# Altium PCB A313.2.PcbDoc (part 1 of 3)
Units mm, origin at the board's own origin, x right, y up, seen from the top; angles counter-clockwise.
Board outline 230.01 x 157.01 mm, 2 copper layers (Top Layer, Bottom Layer); 268 components, 266 nets, 1114 pads, 1214 vias.
Unrouted connection lines stored in the file: 2.
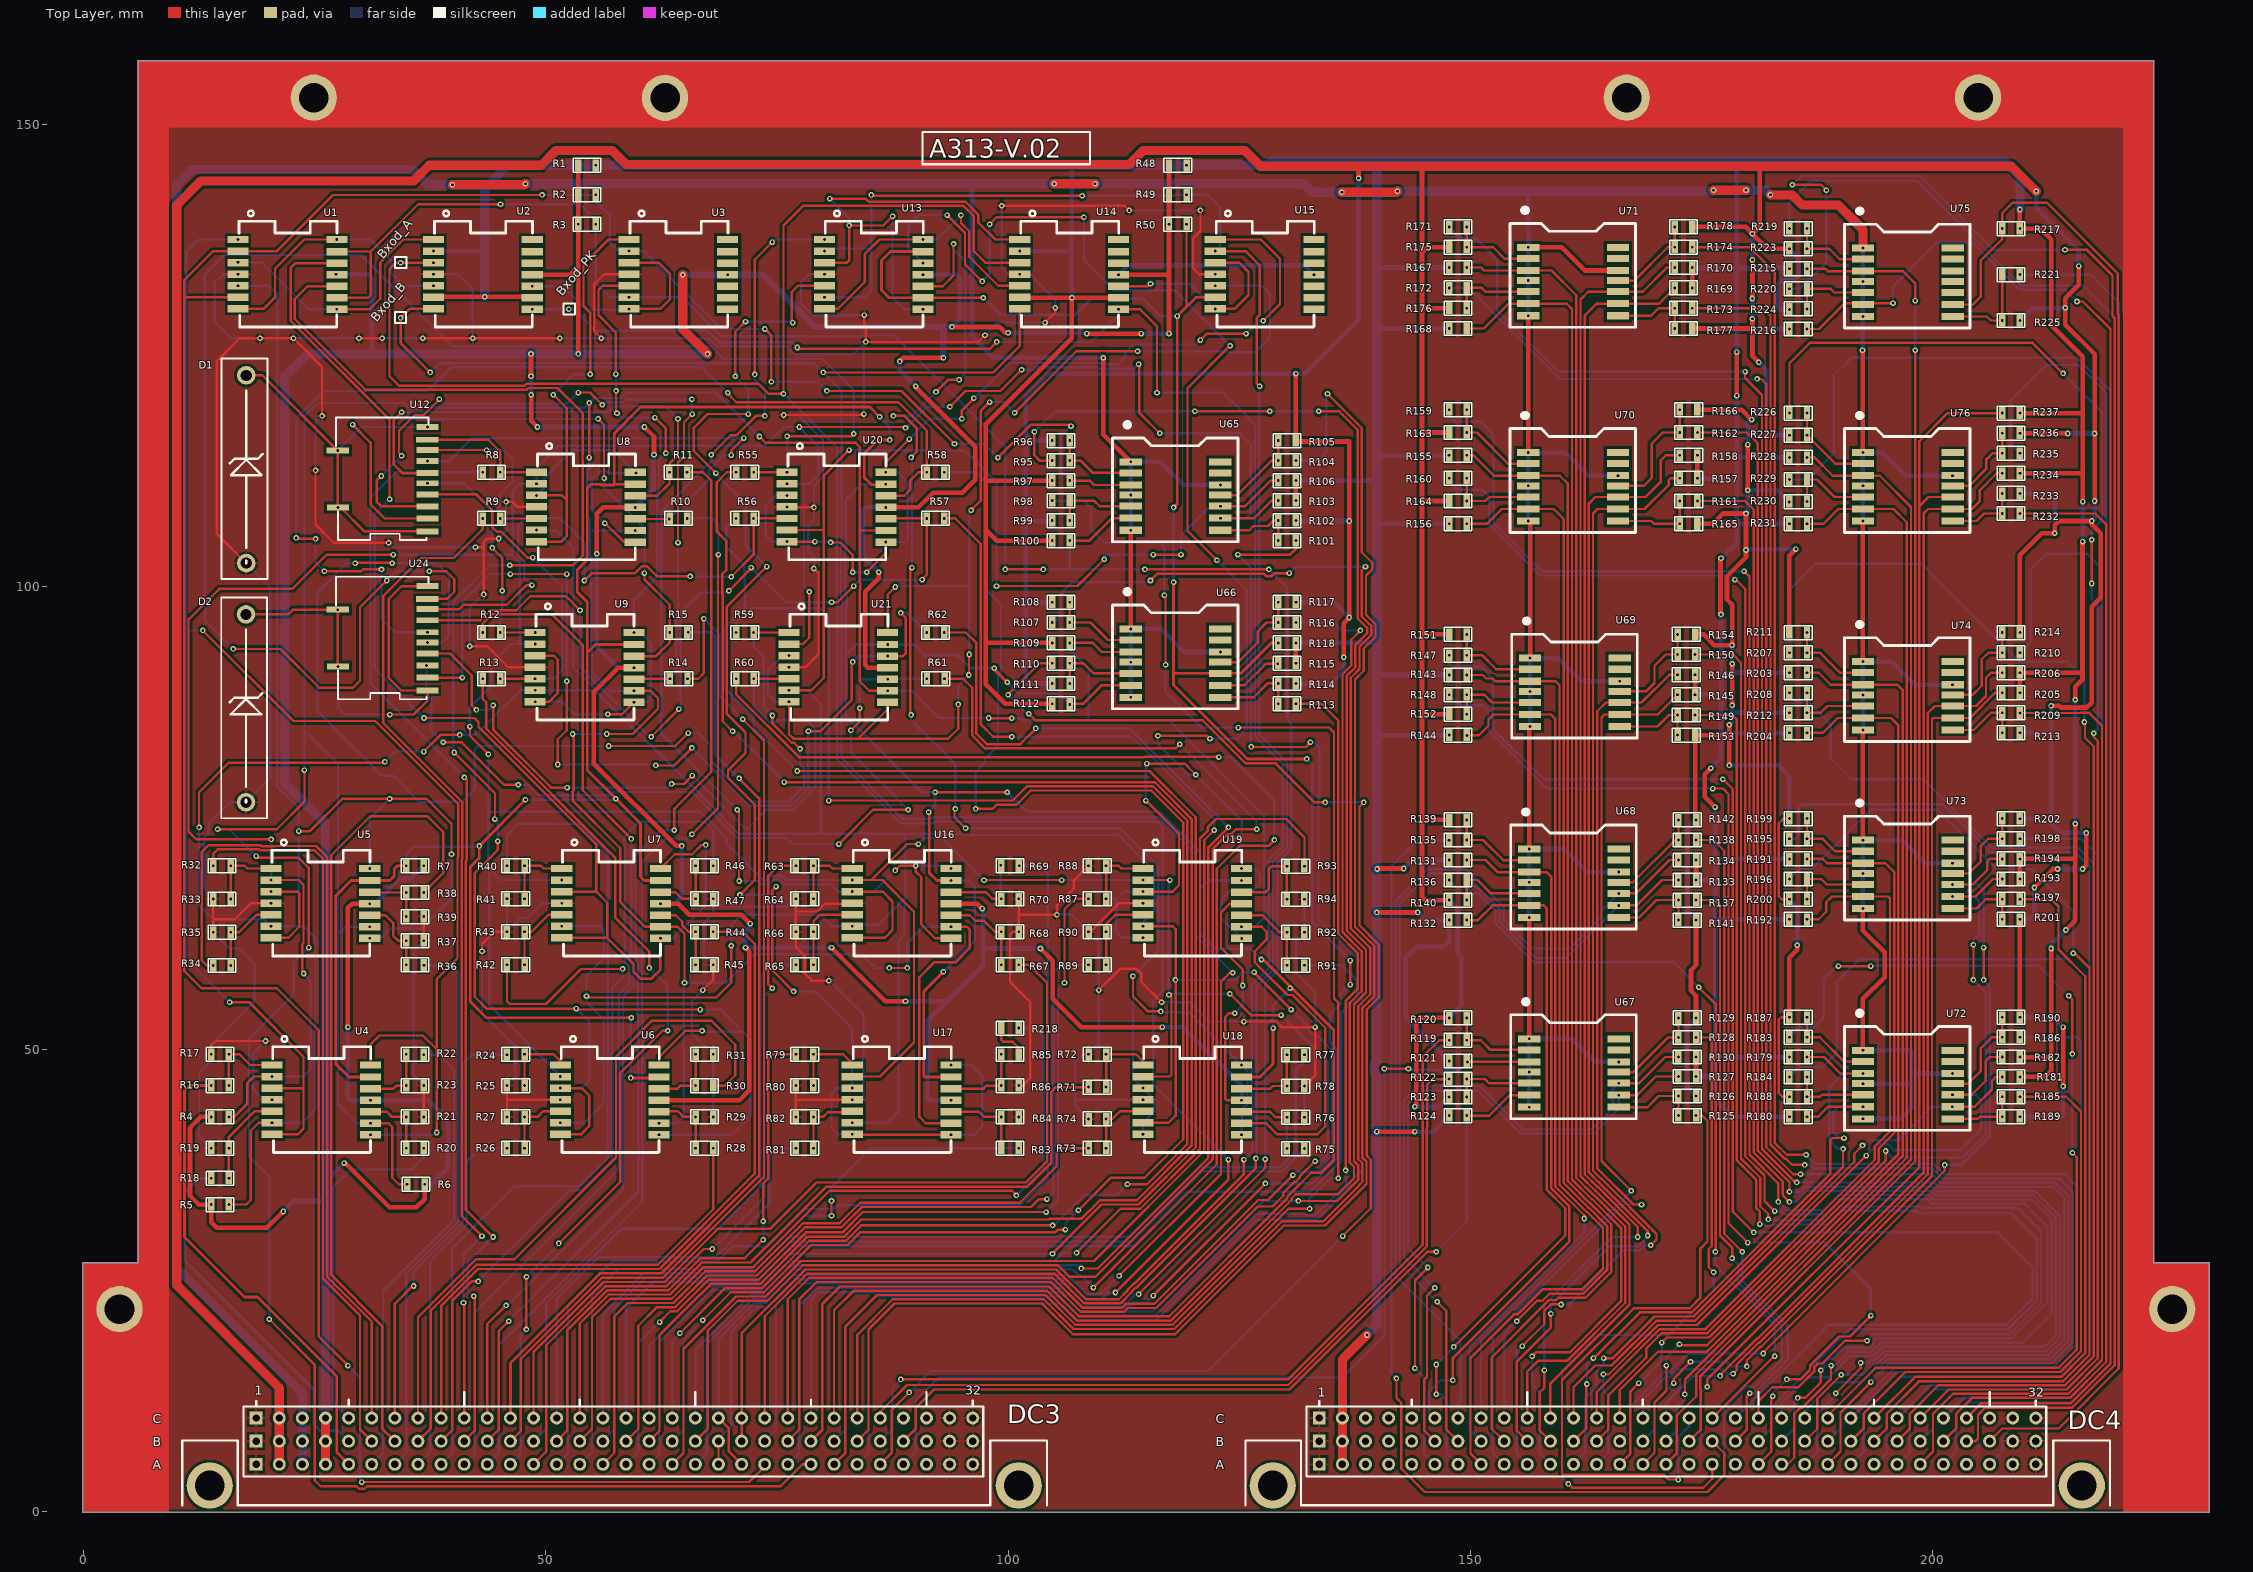
[diagram p0: Top Layer view]
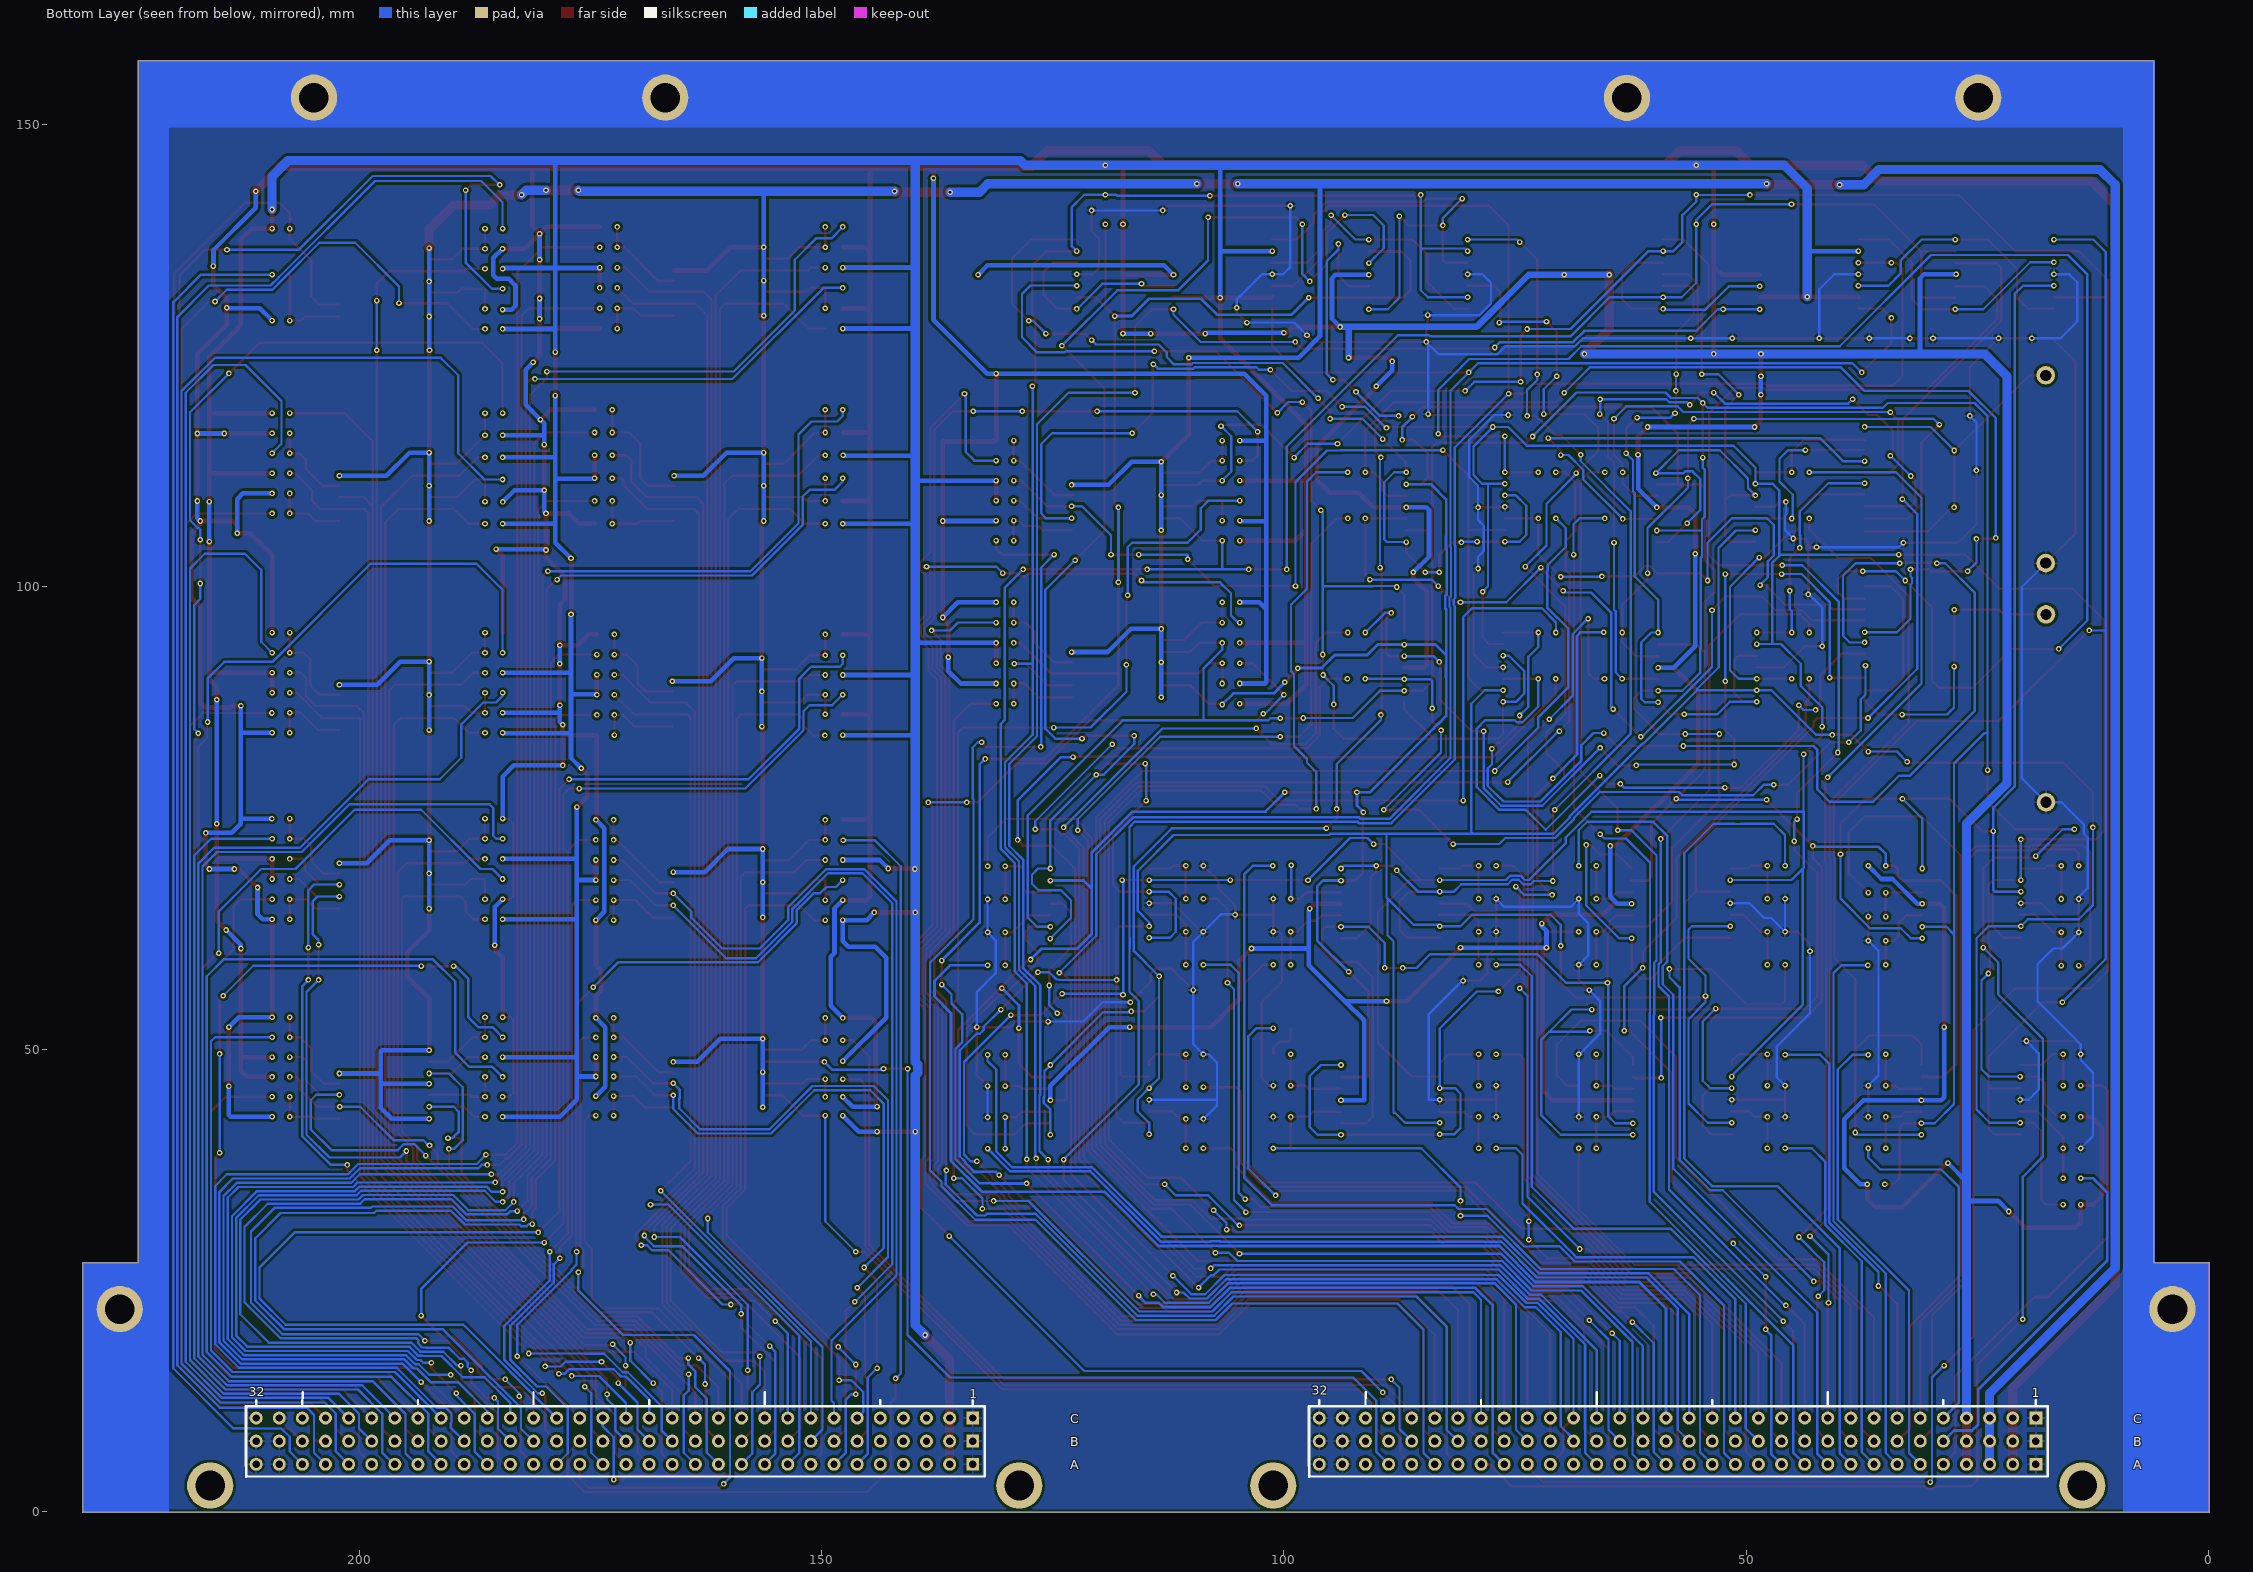
[diagram p1: Bottom Layer view, seen from below]

## Layer stack, top to bottom
Top Solder: solder mask 0.0102, Solder Resist, Dk 3.5
Top Layer: signal copper 0.0356
Dielectric1: dielectric 0.32, FR-4, Dk 4.8
Bottom Layer: signal copper 0.0356
Bottom Solder: solder mask 0.0102, Solder Resist, Dk 3.5

## Board outline
-0.095,-0.079 -0.095,26.921 cw(c-0.088,26.921) -0.088,26.928 5.905,26.928 5.905,156.921 cw(c5.912,156.921) 5.912,156.928 223.912,156.928 cw(c223.912,156.921) 223.919,156.921 223.919,26.928 229.912,26.928 cw(c229.912,26.921) 229.919,26.921 229.919,-0.079 cw(c229.912,-0.079) 229.912,-0.086 -0.088,-0.086 cw(c-0.088,-0.079)

## Design rules (kind name [scope] priority, off if disabled: settings)
Clearance [All] p1: gap=0.3 ignorepadtopadclearanceinfootprint=FALSE except(0: Arc-Hole Track-Hole SMDPad-Hole THPad-Hole Via-Hole Fill-Hole Poly-Hole Region-Hole Text-Hole; 0.1: SMDPad-SMDPad SMDPad-THPad THPad-THPad Fill-Fill Fill-Poly Fill-Region Poly-Poly Poly-Region Region-Region; 0.2: Arc-Arc Arc-Track Track-Track)
PolygonConnect [All] p1: connectstyle=Relief reliefconductorwidth=0.254 reliefentries=4 polygonreliefangle="90 Angle" airgapwidth=0.254
RoutingVias [All] p1: holewidth=0.3 width=0.6 viastyle="Through Hole" minholewidth=0.3 minwidth=0.6 maxholewidth=0.3 maxwidth=0.6
SolderMaskExpansion [All] p1: expansion=0.102
Width [All] p1: maxlimit=1 minlimit=0.254 preferedwidth=0.5
30 further rules are at their usual default settings.

## Components (designator, comment, footprint, x,y, rotation, side; value= is the part's Value field where it differs from the comment)
D1 "DIODE ZENER" "DIODE ZENER" 17.6,102.448 r0 top
D2 "DIODE ZENER" "DIODE ZENER" 17.575,76.59 r0 top
DC3 "DC96c" DC96c_DUC 52.95,23.196 r0 top locked
DC4 "DC96c" DC96c_DUC 167.925,23.196 r0 top locked
R1 "330K" R0805 53.776,145.693 r270 top
R2 "330K" R0805 53.776,142.509 r270 top
R3 "330K" R0805 53.776,139.325 r270 top
R4 "330K" R0805 14.1,42.783 r270 top
R5 "330K" R0805 14.1,33.3 r270 top
R6 "330K" R0805 36.624,35.307 r90 top
R7 "330K" R0805 36.526,69.757 r90 top
R8 "18k" R0805 43.451,112.494 r270 top
R9 "18k" R0805 43.451,107.511 r270 top
R10 "18k" R0805 65.024,107.325 r90 top
R11 "18k" R0805 65,112.308 r90 top
R12 "18k" R0805 43.451,95.168 r270 top
R13 "18k" R0805 43.451,90.175 r270 top
R14 "18k" R0805 65.049,89.989 r90 top
R15 "18k" R0805 65.024,94.982 r90 top
R16 "R" R0805 14.1,46.167 r270 top
R17 "R" R0805 14.1,49.55 r270 top
R18 "R" R0805 14.1,36.15 r270 top
R19 "R" R0805 14.1,39.4 r270 top
R20 "R" R0805 36.526,39.214 r90 top
R21 "R" R0805 36.526,42.597 r90 top
R22 "R" R0805 36.526,49.364 r90 top
R23 "R" R0805 36.526,45.981 r90 top
R24 "R" R0805 46.076,49.55 r270 top
R25 "R" R0805 46.076,46.167 r270 top
R26 "R" R0805 46.076,39.4 r270 top
R27 "R" R0805 46.076,42.783 r270 top
R28 "R" R0805 67.825,39.214 r90 top
R29 "R" R0805 67.825,42.597 r90 top
R30 "R" R0805 67.825,45.981 r90 top
R31 "R" R0805 67.825,49.364 r90 top
R32 "10K" R0805 14.3,69.943 r270 top
R33 "5K" R0805 14.3,66.346 r270 top
R34 "10K" R0805 14.3,59.152 r270 top
R35 "5K" R0805 14.3,62.749 r270 top
R36 "10K" R0805 36.526,59.039 r90 top
R37 "5K" R0805 36.526,61.658 r90 top
R38 "R" R0805 36.526,66.861 r90 top
R39 "R" R0805 36.526,64.26 r90 top
R40 "R" R0805 46.076,69.943 r270 top
R41 "R" R0805 46.076,66.37 r270 top
R42 "R" R0805 46.076,59.225 r270 top
R43 "R" R0805 46.076,62.798 r270 top
R44 "R" R0805 67.825,62.612 r90 top
R45 "R" R0805 67.825,59.039 r90 top
R46 "R" R0805 67.825,69.757 r90 top
R47 "R" R0805 67.825,66.184 r90 top
R48 "330K" R0805 117.676,145.693 r270 top
R49 "330K" R0805 117.676,142.509 r270 top
R50 "330K" R0805 117.676,139.325 r270 top
R55 "18k" R0805 70.85,112.494 r270 top
R56 "18k" R0805 70.85,107.511 r270 top
R57 "18k" R0805 92.825,107.325 r90 top
R58 "18k" R0805 92.825,112.308 r90 top
R59 "18k" R0805 70.85,95.168 r270 top
R60 "18k" R0805 70.875,90.175 r270 top
R61 "18k" R0805 92.85,89.989 r90 top
R62 "18k" R0805 92.825,94.982 r90 top
R63 "R" R0805 77.325,69.943 r270 top
R64 "R" R0805 77.325,66.37 r270 top
R65 "R" R0805 77.325,59.225 r270 top
R66 "R" R0805 77.325,62.798 r270 top
R67 "R" R0805 100.874,59.039 r90 top
R68 "R" R0805 100.874,62.612 r90 top
R69 "R" R0805 100.874,69.757 r90 top
R70 "R" R0805 100.874,66.184 r90 top
R71 "R" R0805 108.976,46.004 r270 top
R72 "R" R0805 108.976,49.55 r270 top
R73 "R" R0805 108.976,39.4 r270 top
R74 "R" R0805 108.976,42.564 r270 top
R75 "R" R0805 131.775,39.164 r90 top
R76 "R" R0805 131.775,42.547 r90 top
R77 "R" R0805 131.775,49.314 r90 top
R78 "R" R0805 131.775,45.931 r90 top
R79 "R" R0805 77.325,49.55 r270 top
R80 "R" R0805 77.325,46.167 r270 top
R81 "R" R0805 77.325,39.4 r270 top
R82 "R" R0805 77.325,42.783 r270 top
R83 "R" R0805 100.874,39.214 r90 top
R84 "R" R0805 100.874,42.597 r90 top
R85 "R" R0805 100.874,49.364 r90 top
R86 "R" R0805 100.874,45.981 r90 top
R87 "R" R0805 108.976,66.37 r270 top
R88 "R" R0805 108.976,69.943 r270 top
R89 "R" R0805 108.976,59.225 r270 top
R90 "R" R0805 108.976,62.798 r270 top
R91 "R" R0805 131.775,58.989 r90 top
R92 "R" R0805 131.775,62.562 r90 top
R93 "R" R0805 131.775,69.707 r90 top
R94 "R" R0805 131.775,66.134 r90 top
R95 "2,2k" R0805 106.4,113.576 r90 top
R96 "33k" R0805 105.052,115.925 r270 top
R97 "4,7k" R0805 106.4,111.413 r90 top
R98 "2,2k" R0805 106.4,109.251 r90 top
R99 "33k" R0805 105.052,107.274 r270 top
R100 "4,7k" R0805 106.4,104.925 r90 top
R101 "2,2k" R0805 129.5,105.111 r270 top
R102 "33k" R0805 130.848,107.088 r90 top
R103 "4,7k" R0805 129.5,109.437 r270 top
R104 "2,2k" R0805 129.5,113.762 r270 top
R105 "33k" R0805 130.848,115.739 r90 top
R106 "4,7k" R0805 129.5,111.599 r270 top
R107 "2,2k" R0805 106.4,96.059 r90 top
R108 "33k" R0805 105.052,98.443 r270 top
R109 "4,7k" R0805 106.4,93.861 r90 top
R110 "2,2k" R0805 106.4,91.664 r90 top
R111 "33k" R0805 105.052,89.652 r270 top
R112 "4,7k" R0805 106.4,87.268 r90 top
R113 "2,2k" R0805 129.5,87.454 r270 top
R114 "33k" R0805 130.848,89.466 r90 top
R115 "4,7k" R0805 129.5,91.85 r270 top
R116 "2,2k" R0805 129.5,96.245 r270 top
R117 "33k" R0805 130.848,98.257 r90 top
R118 "4,7k" R0805 129.5,94.047 r270 top
R119 "2,2k" R0805 149.323,50.888 r90 top
R120 "33k" R0805 147.975,53.488 r270 top
R121 "4,7k" R0805 149.323,48.638 r90 top
R122 "2,2k" R0805 149.323,46.688 r90 top
R123 "33k" R0805 147.975,44.938 r270 top
R124 "4,7k" R0805 149.323,42.738 r90 top
R125 "2,2k" R0805 172.775,42.924 r270 top
R126 "33k" R0805 174.123,44.851 r90 top
R127 "4,7k" R0805 172.775,47.149 r270 top
R128 "2,2k" R0805 172.775,51.375 r270 top
R129 "33k" R0805 174.123,53.302 r90 top
R130 "4,7k" R0805 172.775,49.262 r270 top
R131 "4,7k" R0805 149.323,70.381 r90 top
R132 "4,7k" R0805 149.323,63.878 r90 top
R133 "4,7k" R0805 172.775,68.4 r270 top
R134 "4,7k" R0805 172.775,70.567 r270 top
R135 "2,2k" R0805 149.323,72.549 r90 top
R136 "2,2k" R0805 149.323,68.214 r90 top
R137 "2,2k" R0805 172.775,66.232 r270 top
R138 "2,2k" R0805 172.775,72.735 r270 top
R139 "33k" R0805 147.975,74.903 r270 top
R140 "33k" R0805 147.975,66.232 r270 top
R141 "33k" R0805 174.123,63.878 r90 top
R142 "33k" R0805 174.123,74.717 r90 top
R143 "4,7k" R0805 149.323,90.388 r90 top
R144 "4,7k" R0805 149.323,83.888 r90 top
R145 "4,7k" R0805 172.675,88.429 r270 top
R146 "4,7k" R0805 172.675,90.607 r270 top
R147 "2,2k" R0805 149.323,92.513 r90 top
R148 "2,2k" R0805 149.323,88.263 r90 top
R149 "2,2k" R0805 172.675,86.252 r270 top
R150 "2,2k" R0805 172.675,92.785 r270 top
R151 "33k" R0805 147.975,94.963 r270 top
R152 "33k" R0805 147.975,86.338 r270 top
R153 "33k" R0805 174.023,83.888 r90 top
R154 "33k" R0805 174.023,94.777 r90 top
R155 "4,7k" R0805 149.323,114.145 r90 top
R156 "4,7k" R0805 149.323,106.745 r90 top
R157 "4,7k" R0805 172.925,111.864 r270 top
R158 "4,7k" R0805 172.925,114.331 r270 top
R159 "2,2k" R0805 149.323,119.078 r90 top
R160 "2,2k" R0805 149.323,111.678 r90 top
R161 "2,2k" R0805 172.925,109.397 r270 top
R162 "2,2k" R0805 172.925,116.797 r270 top
R163 "33k" R0805 147.975,116.797 r270 top
R164 "33k" R0805 147.975,109.397 r270 top
R165 "33k" R0805 174.273,106.745 r90 top
R166 "33k" R0805 174.273,119.078 r90 top
R167 "4,7k" R0805 149.323,134.452 r90 top
R168 "4,7k" R0805 149.323,127.859 r90 top
R169 "4,7k" R0805 172.375,132.44 r270 top
R170 "4,7k" R0805 172.375,134.638 r270 top
R171 "2,2k" R0805 149.323,138.848 r90 top
R172 "2,2k" R0805 149.323,132.254 r90 top
R173 "2,2k" R0805 172.375,130.243 r270 top
R174 "2,2k" R0805 172.375,136.836 r270 top
R175 "33k" R0805 147.975,136.836 r270 top
R176 "33k" R0805 147.975,130.243 r270 top
R177 "33k" R0805 173.723,127.859 r90 top
R178 "33k" R0805 173.723,138.848 r90 top
R179 "4,7k" R0805 186.123,49.067 r90 top
R180 "4,7k" R0805 186.123,42.624 r90 top
R181 "4,7k" R0805 207.8,47.105 r270 top
R182 "4,7k" R0805 207.8,49.253 r270 top
R183 "2,2k" R0805 186.123,51.215 r90 top
R184 "2,2k" R0805 186.123,46.92 r90 top
R185 "2,2k" R0805 207.8,44.958 r270 top
R186 "2,2k" R0805 207.8,51.401 r270 top
R187 "33k" R0805 184.775,53.549 r270 top
R188 "33k" R0805 184.775,44.958 r270 top
R189 "33k" R0805 209.148,42.624 r90 top
R190 "33k" R0805 209.148,53.363 r90 top
R191 "4,7k" R0805 186.123,70.5 r90 top
R192 "4,7k" R0805 186.123,63.967 r90 top
R193 "4,7k" R0805 207.8,68.509 r270 top
R194 "4,7k" R0805 207.8,70.686 r270 top
R195 "2,2k" R0805 186.123,72.678 r90 top
R196 "2,2k" R0805 186.123,68.323 r90 top
R197 "2,2k" R0805 207.8,66.331 r270 top
R198 "2,2k" R0805 207.8,72.864 r270 top
R199 "33k" R0805 184.775,75.042 r270 top
R200 "33k" R0805 184.775,66.331 r270 top
R201 "33k" R0805 209.148,63.967 r90 top
R202 "33k" R0805 209.148,74.856 r90 top
R203 "4,7k" R0805 186.123,90.636 r90 top
R204 "4,7k" R0805 186.123,84.133 r90 top
R205 "4,7k" R0805 207.8,88.655 r270 top
R206 "4,7k" R0805 207.8,90.822 r270 top
R207 "2,2k" R0805 186.123,92.804 r90 top
R208 "2,2k" R0805 186.123,88.469 r90 top
R209 "2,2k" R0805 207.8,86.487 r270 top
R210 "2,2k" R0805 207.8,92.99 r270 top
R211 "33k" R0805 184.775,95.158 r270 top
R212 "33k" R0805 184.775,86.487 r270 top
R213 "33k" R0805 209.148,84.133 r90 top
R214 "33k" R0805 209.148,94.972 r90 top
R215 "4,7k" R0805 186.123,134.323 r90 top
R216 "4,7k" R0805 186.123,127.813 r90 top
R217 "4,7k" R0805 207.8,138.849 r270 top
R218 "R" R0805 100.874,52.2 r90 top (schematic designator R85)
R219 "2,2k" R0805 186.123,138.663 r90 top
R220 "2,2k" R0805 186.123,132.153 r90 top
R221 "2,2k" R0805 207.8,133.879 r270 top
R223 "33k" R0805 184.775,136.679 r270 top
R224 "33k" R0805 184.775,130.169 r270 top
R225 "33k" R0805 209.148,128.724 r90 top
R226 "2,2k" R0805 186.123,118.709 r90 top
R227 "33k" R0805 184.775,116.502 r270 top
R228 "4,7k" R0805 186.123,113.923 r90 top
R229 "2,2k" R0805 186.123,111.53 r90 top
R230 "33k" R0805 184.775,109.323 r270 top
R231 "4,7k" R0805 186.123,106.745 r90 top
R232 "2,2k" R0805 207.8,108.045 r270 top
R233 "33k" R0805 209.148,110.029 r90 top
R234 "4,7k" R0805 207.8,112.385 r270 top
R235 "2,2k" R0805 207.8,114.555 r270 top
R236 "33k" R0805 209.148,116.539 r90 top
R237 "4,7k" R0805 207.8,118.895 r270 top
U1 "168KT2B" 168KT2B-1 16.825,139.4 r0 top
U2 "168KT2B" 168KT2B-1 37.96,139.4 r0 top
U3 "168KT2B" 168KT2B-1 59.095,139.4 r0 top
U4 "168KT2B" 168KT2B-1 20.475,50.125 r0 top
U5 "168KT2B" 168KT2B-1 20.392,71.376 r0 top
U6 "168KT2B" 168KT2B-1 51.675,50.125 r0 top
U7 "168KT2B" 168KT2B-1 51.819,71.376 r0 top
U8 "168KT2B" 168KT2B-1 49.1,114.232 r0 top
U9 "168KT2B" 168KT2B-1 48.95,96.9 r0 top
U12 "2D908A" 2d908a 27.316,118.28 r270 top
U13 "168KT2B" 168KT2B-1 80.23,139.4 r0 top
U14 "168KT2B" 168KT2B-1 101.365,139.4 r0 top
U15 "168KT2B" 168KT2B-1 122.5,139.4 r0 top
U16 "168KT2B" 168KT2B-1 83.247,71.376 r0 top
U17 "168KT2B" 168KT2B-1 83.247,50.125 r0 top
U18 "168KT2B" 168KT2B-1 114.675,50.125 r0 top
U19 "168KT2B" 168KT2B-1 114.675,71.376 r0 top
U20 "168KT2B" 168KT2B-1 76.2,114.232 r0 top
U21 "168KT2B" 168KT2B-1 76.4,96.9 r0 top
U24 "2D908A" 2d908a 27.316,101.067 r270 top
U65 "198-HT7" 198-ht7 116.425,112.9 r270 top
U66 "198-HT7" 198-ht7 116.425,94.828 r270 top
U67 "198-HT7" 198-ht7 159.517,50.5 r270 top
U68 "198-HT7" 198-ht7 159.517,71.025 r270 top
U69 "198-HT7" 198-ht7 159.617,91.669 r270 top
U70 "198-HT7" 198-ht7 159.417,113.9 r270 top
U71 "198-HT7" 198-ht7 159.417,136.098 r270 top
U72 "198-HT7" 198-ht7 195.615,49.25 r270 top
U73 "198-HT7" 198-ht7 195.615,71.984 r270 top
U74 "198-HT7" 198-ht7 195.615,91.293 r270 top
U75 "198-HT7" 198-ht7 195.615,136.016 r270 top
U76 "198-HT7" 198-ht7 195.615,113.9 r270 top

## Footprints (in the part's own frame and the unit in brackets; to place one, negate y for a bottom-side part, rotate by r counter-clockwise, add the part's x,y. Pads: shape width x height; smd on the part's side, far side on the other; paste and mask are expansions set on the pad)
2d908a [mil]
  rect 25x95 smd: 1(427.83,389.13) 2(376.64,389.13) 3(325.48,389.13) 4(278.23,389.13) 5(234.93,389.13) 6(183.74,389.13) 7(136.49,389.13) 8(92.63,388.01) 9(38.36,389.08) 10(138.63,6.81) 11(381.16,8.11) 12(482.83,389.08)
  silkscreen extent -1,-1 520,394
168KT2B-1 [mm]
  rect 2.286x0.8 smd: 1(-0.1,-1.824) 2(-0.1,-3.074) 3(-0.1,-4.324) 4(-0.1,-5.574) 5(-0.1,-6.824) 6(-0.1,-8.074) 7(-0.1,-9.324) 8(10.575,-9.374) 9(10.575,-8.124) 10(10.575,-6.874) 11(10.575,-5.624) 12(10.575,-4.374) 13(10.575,-3.124) 14(10.575,-1.824)
  silkscreen extent 0,-11.28 10.6,1.3
198-ht7 [mil]
  rect 30x95 smd: 1(-25.04,-124.68) 2(22.21,-124.68) 3(73.4,-124.68) 4(116.7,-124.68) 5(163.95,-124.68) 6(215.11,-124.68) 7(266.3,-124.68) 8(266.3,257.2) 9(215.11,257.2) 10(163.95,257.2) 11(116.7,257.2) 12(73.4,257.2) 13(22.21,257.2) 14(-25.04,257.2)
  silkscreen extent -183,-203 315,332
DC96c_DUC [mm]
  round 5 hole 3.2: A(-39.3,-20.375) B(48.2,-20.375)
  rect 1.4x1.4 hole 0.8: A1(-34.275,-18.075) B1(-34.275,-15.575) C1(-34.275,-13.075)
  round 1.4 hole 0.8: A2(-31.775,-18.075) A3(-29.275,-18.075) A4(-26.775,-18.075) A5(-24.275,-18.075) A6(-21.775,-18.075) A7(-19.275,-18.075) A8(-16.775,-18.075) A9(-14.275,-18.075) A10(-11.775,-18.075) A11(-9.275,-18.075) A12(-6.775,-18.075) A13(-4.275,-18.075) A14(-1.775,-18.075) A15(0.725,-18.075) A16(3.225,-18.075) A17(5.725,-18.075) A18(8.225,-18.075) A19(10.725,-18.075) A20(13.225,-18.075) A21(15.725,-18.075) A22(18.225,-18.075) A23(20.725,-18.075) A24(23.225,-18.075) A25(25.725,-18.075) A26(28.225,-18.075) A27(30.725,-18.075) A28(33.225,-18.075) A29(35.725,-18.075) A30(38.225,-18.075) A31(40.725,-18.075) A32(43.225,-18.075) B2(-31.775,-15.575) B3(-29.275,-15.575) B4(-26.775,-15.575) B5(-24.275,-15.575) B6(-21.775,-15.575) B7(-19.275,-15.575) B8(-16.775,-15.575) B9(-14.275,-15.575) B10(-11.775,-15.575) B11(-9.275,-15.575) B12(-6.775,-15.575) B13(-4.275,-15.575) B14(-1.775,-15.575) B15(0.725,-15.575) B16(3.225,-15.575) B17(5.725,-15.575) B18(8.225,-15.575) B19(10.725,-15.575) B20(13.225,-15.575) B21(15.725,-15.575) B22(18.225,-15.575) B23(20.725,-15.575) B24(23.225,-15.575) B25(25.725,-15.575) B26(28.225,-15.575) B27(30.725,-15.575) B28(33.225,-15.575) B29(35.725,-15.575) B30(38.225,-15.575) B31(40.725,-15.575) B32(43.225,-15.575) C2(-31.775,-13.075) C3(-29.275,-13.075) C4(-26.775,-13.075) C5(-24.275,-13.075) C6(-21.775,-13.075) C7(-19.275,-13.075) C8(-16.775,-13.075) C9(-14.275,-13.075) C10(-11.775,-13.075) C11(-9.275,-13.075) C12(-6.775,-13.075) C13(-4.275,-13.075) C14(-1.775,-13.075) C15(0.725,-13.075) C16(3.225,-13.075) C17(5.725,-13.075) C18(8.225,-13.075) C19(10.725,-13.075) C20(13.225,-13.075) C21(15.725,-13.075) C22(18.225,-13.075) C23(20.725,-13.075) C24(23.225,-13.075) C25(25.725,-13.075) C26(28.225,-13.075) C27(30.725,-13.075) C28(33.225,-13.075) C29(35.725,-13.075) C30(38.225,-13.075) C31(40.725,-13.075) C32(43.225,-13.075)
  silkscreen extent -42.25,-22.5 51.25,-10.3
"DIODE ZENER" [mm]
  round 2 hole 1.2: 1(0,0.125) 2(0,20.445)
  silkscreen extent -2.67,-1.6 2.29,22.28
R0805 [mm]
  rect 1.3x0.7 smd: 1(0.093,1.624) 2(0.093,-0.276)
  silkscreen extent -0.66,-0.83 0.84,2.17

## Part data
R1 R2 R3 R4 R5 R6 R7 R8 R9 R10 R11 R12 R13 R14 R15 R32 R33 R34 R35 R36 R37 R48 R49 R50 R55 R56 R57 R58 R59 R60 R61 R62 R95 R96 R97 R98 R99 R100 R101 R102 R103 R104 R105 R106 R107 R108 R109 R110 R111 R112 R113 R114 R115 R116 R117 R118 R119 R120 R121 R122 R123 R124 R125 R126 R127 R128 R129 R130 R131 R132 R133 R134 R135 R136 R137 R138 R139 R140 R141 R142 R143 R144 R145 R146 R147 R148 R149 R150 R151 R152 R153 R154 R155 R156 R157 R158 R159 R160 R161 R162 R163 R164 R165 R166 R167 R168 R169 R170 R171 R172 R173 R174 R175 R176 R177 R178 R179 R180 R181 R182 R183 R184 R185 R186 R187 R188 R189 R190 R191 R192 R193 R194 R195 R196 R197 R198 R199 R200 R201 R202 R203 R204 R205 R206 R207 R208 R209 R210 R211 R212 R213 R214 R215 R216 R217 R219 R220 R221 R223 R224 R225 R226 R227 R228 R229 R230 R231 R232 R233 R234 R235 R236 R237: library part R
U1: library part 168KT2B_0
U2 U3 U4 U5 U6 U7 U8 U9 U13 U14 U15 U16 U17 U18 U19 U20 U21: library part 168KT2B_5
U12: library part 2D908A_1
U24: library part 2D908A_2
U65 U66 U67 U68 U69 U70 U71 U72 U73 U74 U75 U76: library part 198-HT7_0

## Free pads (board coordinates)
  round 5 hole 3.2: 2(3.9,21.9) 2(24.9,152.921) 2(62.9,152.9) 2(166.9,152.921) 2(204.9,152.921) 2(225.9,21.9)

## Via types
v1: diameter 0.6, hole 0.3, Top Layer to Bottom Layer, 1214 vias

## Nets (pads, with @x,y where several pads share a name; then routed paths per layer and width w, separated by ;. In a path a pad name is that pad's centre, name@x,y a point inside that pad or via, vN(x,y) a via of type N, cw(c..) or ccw(c..) an arc to the next point about the centre after c; other vN are vias at no path point)
1-1: R8.1 U8.1 U12.8 | length 14.6
  Top Layer w0.254: U12.8@37.172,115.927 43.773,115.927 45.075,114.625 v1(45.075,112.401) 45.082,112.408 U8.1@49,112.408
1-2: R9.1 U8.5 U12.7 | length 20.6
  Top Layer w0.254: U12.7@37.2,114.813 43.587,114.813 v1(43.6,114.8) ; v1(45.085,107.408) U8.5@49,107.408
  Bottom Layer w0.254: v1(43.6,114.8) 45.462,114.8 46.4,113.862 46.4,111.41 44.973,109.983 44.973,107.52 v1(45.085,107.408)
1-3: R10.1 U8.10 U12.6 | length 51.6
  Top Layer w0.254: U8.10@59.675,107.358 v1(63.34,107.358) R10.1@63.4,107.418 ; v1(70.049,114.267) 70.049,114.749 v1(71.4,116.1)
  Bottom Layer w0.254: v1(37.2,113.613) 39.535,113.613 42.022,116.1 v1(71.4,116.1) ; v1(63.34,107.358) 67.618,111.636 67.618,112.676 69.209,114.267 v1(70.049,114.267)
1-4: R11.1 U8.12 U12.5 | length 52.4
  Top Layer w0.254: v1(34.4,118.9) 33.554,118.054 33.554,113.246 34.487,112.313 U12.5@37.2,112.313 ; U8.12@59.675,109.858 62.058,109.858 63.376,111.176 v1(63.376,112.401) 63.376,113.338 64.3,114.262 v1(64.3,118.2)
  Bottom Layer w0.254: v1(34.4,118.9) 34.427,118.927 56.799,118.927 57.399,119.527 62.973,119.527 v1(64.3,118.2)
1-5: R12.1 U9.1 U12.4 | length 25.7
  Top Layer w0.254: v1(44.2,104.222) 45.3,103.122 v1(45.3,99.6) ; v1(45.075,95.075) v1(48.849,95.075) U9.1@48.85,95.076
  Bottom Layer w0.254: v1(37.2,111.213) 41.131,111.213 44.2,108.144 44.2,105.57 44.173,105.543 44.173,104.249 v1(44.2,104.222) ; v1(45.075,95.075) 45.075,97.375 45.3,97.6 v1(45.3,99.6)
1-6: R13.1 U9.5 U12.3 | length 35.9
  Top Layer w0.254: U12.3@37.2,110.013 42.514,110.013 44.2,108.327 44.2,106.5 44.731,105.969 45.201,105.969 47.992,103.178 v1(48.6,103.178) ; v1(45.075,90.082) v1(48.844,90.082) U9.5@48.85,90.076
  Bottom Layer w0.254: v1(48.6,103.178) 51.756,100.022 51.756,91.004 50.834,90.082 v1(48.844,90.082)
1-7: R14.1 U9.10 U12.2 | length 84.3
  Top Layer w0.254: v1(32.2,112) 31.7,111.5 31.7,109.244 32.23,108.713 U12.2@37.2,108.713 ; v1(34.4,114.2) 34.127,114.473 34.127,116.903 35.824,118.6 36.8,118.6 v1(38.5,120.3) ; v1(53.5,121.027) 54.773,121.027 v1(56.1,119.7) ; U9.10@59.525,90.026 59.581,90.082 v1(63.425,90.082) ; v1(64.3,104.8) 64.3,113.446 64.954,114.1 64.954,117.823 v1(65.831,118.7)
  Bottom Layer w0.254: v1(32.2,112) v1(34.4,114.2) ; v1(38.5,120.3) 38.965,119.835 52.308,119.835 v1(53.5,121.027) ; v1(56.1,119.7) 56.381,119.981 58.323,119.981 58.642,120.3 v1(65.8,120.3) 65.8,118.731 v1(65.831,118.7) ; v1(63.425,90.082) 64.127,90.784 64.127,97.369 64.3,97.542 v1(64.3,104.8)
1-8: R15.1 U9.12 U12.1 | length 74.9
  Top Layer w0.254: v1(29.1,117.561) 31.076,115.585 31.076,108.924 32.587,107.413 U12.1@37.2,107.413 ; v1(55.652,118.2) 56.3,117.552 v1(56.3,111.771) ; U9.12@59.525,92.526 61.926,92.526 63.4,94 v1(63.4,95.075) 63.4,98.073 60.67,100.803 v1(60.67,101.5)
  Bottom Layer w0.254: v1(29.1,117.561) 29.739,118.2 34.072,118.2 34.099,118.173 55.625,118.173 v1(55.652,118.2) ; v1(56.3,111.771) 56.3,110.733 60.67,106.363 v1(60.67,101.5)
1A: R16.1 R17.1 U4.1 | length 8.5
  Top Layer w0.254: v1(15.724,46.074) v1(15.724,49.457) 16.874,49.457 18.029,48.301 U4.1@20.375,48.301
1B: R32.1 R33.1 U5.1 | length 8.1
  Top Layer w0.254: v1(15.924,66.253) v1(15.924,69.85) 17.45,69.85 17.747,69.553 U5.1@20.292,69.553
2A: R18.1 R19.1 U4.5 | length 10.3
  Top Layer w0.254: v1(15.724,36.057) v1(15.724,39.307) 15.724,40.524 18.501,43.301 U4.5@20.375,43.301
2B: R34.1 R35.1 U5.5 | length 8.8
  Top Layer w0.254: v1(15.924,59.059) v1(15.924,62.656) 16.825,62.656 18.722,64.553 U5.5@20.292,64.553
3A: R20.1 R21.1 U4.10 | length 7.5
  Top Layer w0.254: U4.10@31.05,43.251 32.82,43.251 33.381,42.69 v1(34.902,42.69) v1(34.902,39.307)
3B: R36.1 R37.1 U5.10 | length 8.5
  Top Layer w0.254: U5.10@30.967,64.503 32.668,64.503 33.5,63.671 33.5,62.264 34.013,61.751 v1(34.902,61.751) v1(34.902,59.132)
4-1: R55.1 U20.1 U24.8 | length 178.9
  Top Layer w0.254: v1(16.2,93.3) 21.3,93.3 25.5,89.1 29.136,89.1 29.9,89.864 29.9,97.8 v1(32.8,100.7) ; U24.8@37.172,98.714 39.327,98.714 40.1,99.487 40.1,100.829 39.229,101.7 v1(37.4,101.7) ; R55.1@72.474,112.401 v1(72.481,112.408) v1(76.1,112.408) ; v1(76.09,116.31) 83.028,116.31 v1(83.3,116.582)
  Bottom Layer w0.254: v1(16.2,93.3) 13.1,96.4 13.1,133.8 15.2,135.9 30,135.9 39.873,126.027 67.843,126.027 69.215,124.655 79.945,124.655 83.3,121.3 v1(83.3,116.582) ; v1(32.8,100.7) 33.8,101.7 v1(37.4,101.7) ; v1(76.09,116.31) 76.1,116.3 v1(76.1,112.408)
4-2: R56.1 U20.5 U24.7 | length 60.1
  Top Layer w0.254: U24.7@37.2,97.6 40.625,97.6 41.098,98.073 45.773,98.073 47.9,100.2 v1(48.5,100.2) ; v1(54.181,100.7) 54.981,101.5 59.642,101.5 60.369,102.227 60.971,102.227 62.052,101.146 v1(65.6,101.146) ; v1(70.054,101.1) 72.474,103.52 v1(72.474,107.418) 76.09,107.418 U20.5@76.1,107.408
  Bottom Layer w0.254: v1(48.5,100.2) 47.654,101.046 47.654,102.788 47.025,103.417 47.025,106.706 47.755,107.436 51.526,107.436 54.181,104.781 v1(54.181,100.7) ; v1(65.6,101.146) 65.646,101.1 v1(70.054,101.1)
4-3: R57.1 U20.10 U24.6 | length 91.9
  Top Layer w0.254: U24.6@37.2,96.4 42.893,96.4 43.981,97.489 46.803,97.489 48.314,99 52.189,99 v1(53.7,97.489) ; v1(61.4,83.8) v1(64.4,86.8) ; v1(69.8,99.6) 72.2,102 v1(72.2,102.1) ; v1(80.9,98.35) 81.55,98.35 v1(83.3,100.1) ; U20.10@86.775,107.358 86.835,107.418 v1(91.201,107.418) 91.201,101.301 v1(90.7,100.8)
  Bottom Layer w0.254: v1(53.7,97.489) 53.7,91.358 61.258,83.8 v1(61.4,83.8) ; v1(64.4,86.8) 64.581,86.981 64.581,97.181 66.8,99.4 69.6,99.4 v1(69.8,99.6) ; v1(72.2,102.1) 75.95,98.35 v1(80.9,98.35) ; v1(83.3,100.1) 84,100.8 v1(90.7,100.8)
4-4: R58.1 U20.12 U24.5 | length 120.3
  Top Layer w0.254: v1(23,105.3) 23.1,105.2 v1(25.1,105.2) ; v1(26.058,101.7) 30.039,101.7 30.239,101.9 v1(32.23,101.9) ; v1(69.67,121) 69.583,121 70.602,119.981 88.142,119.981 91.201,116.922 v1(91.201,112.401) 90.293,112.401 89.4,111.508 89.4,110.5 88.758,109.858 U20.12@86.775,109.858
  Bottom Layer w0.254: v1(23,105.3) 23,118.242 25.958,121.2 37.2,121.2 39.747,123.747 66.923,123.747 v1(69.67,121) ; v1(25.1,105.2) 25.1,102.658 v1(26.058,101.7) ; v1(32.23,101.9) 32.23,101.159 32.073,101.001 32.073,100.399 32.23,100.241 32.23,96.57 33.7,95.1 v1(37.2,95.1)
4-5: R59.1 U21.1 U24.4 | length 127.9
  Top Layer w0.254: v1(29.373,102.573) 29.427,102.627 33.346,102.627 v1(33.4,102.573) ; v1(56.8,82.8) 64,82.8 v1(65.4,84.2) ; v1(72.474,95.075) 76.299,95.075 U21.1@76.3,95.076 ; v1(74.508,86.1) 74.508,85.231 76.593,83.146 76.854,83.146 v1(77.5,82.5)
  Bottom Layer w0.254: v1(29.373,102.573) 28.473,102.573 25.3,99.4 25.3,86.6 32.3,79.6 33.452,79.6 36.271,76.781 40.981,76.781 42.3,78.1 42.3,82.373 42.727,82.8 v1(56.8,82.8) ; v1(33.4,102.573) 38.171,102.573 39.535,101.209 39.535,98.577 39.519,98.561 39.519,94.719 38.8,94 v1(37.2,94) ; v1(65.4,84.2) 66.5,84.2 67.823,82.877 67.823,81.219 72.241,76.801 76.255,76.801 77.946,78.492 77.946,80.382 77.5,80.828 v1(77.5,82.5) ; v1(72.474,95.075) 72.474,93.526 73.554,92.446 73.554,87.054 v1(74.508,86.1)
4-6: R60.1 U21.5 U24.3 | length 77.6
  Top Layer w0.254: U24.3@37.2,92.8 39.629,92.8 42,90.429 42,87.201 v1(42.501,86.7) ; v1(44.3,87.2) 44.3,84.592 50.592,78.3 v1(52.3,78.3) ; v1(63.6,78.7) 64.931,78.7 v1(65.831,79.6) ; v1(72.499,90.082) 72.505,90.076 U21.5@76.3,90.076
  Bottom Layer w0.254: v1(42.501,86.7) 43.8,86.7 v1(44.3,87.2) ; v1(52.3,78.3) 63.2,78.3 v1(63.6,78.7) ; v1(65.831,79.6) 71.677,73.754 73.816,75.893 76.689,75.893 79.127,78.331 79.127,84.701 78.228,85.6 75.036,85.6 74.809,85.373 74.207,85.373 72.499,87.081 v1(72.499,90.082)
4-7: R61.1 U21.10 U24.2 | length 90.2
  Top Layer w0.254: v1(37.1,91.5) U24.2@37.2,91.5 ; v1(38.9,83.2) 40.9,83.2 45.5,78.6 v1(47.025,78.6) ; v1(81.7,72.2) 85.4,75.9 v1(89.2,75.9) ; v1(83,84.5) 83.955,85.455 v1(83.955,86.89) ; v1(91.201,90.076) 91.226,90.051 R61.1@91.226,90.082
  Bottom Layer w0.254: v1(37.1,91.5) 37.1,88.351 37.6,87.851 37.6,84.5 v1(38.9,83.2) ; v1(47.025,78.6) 48.123,78.6 49.246,77.477 56.921,77.477 57.271,77.827 65.831,77.827 68.619,75.039 68.619,74.911 70.684,72.846 76.054,72.846 76.7,72.2 v1(81.7,72.2) ; v1(83,84.5) 83,82.1 v1(89.2,75.9) ; v1(83.955,86.89) 83.955,89.8 84.181,90.026 v1(86.975,90.026) 87.025,90.076 v1(91.201,90.076)
4-8: R62.1 U21.12 U24.1 | length 107.6
  Top Layer w0.254: U24.1@37.2,90.2 40.977,90.2 v1(40.981,90.204) ; v1(46.175,101.4) v1(52.271,101.4) ; v1(51.3,80.8) 51.3,83.528 52.271,84.499 v1(52.271,89.8) ; v1(61.9,80.7) 63.9,80.7 v1(65.8,82.6) ; v1(78.4,84.4) 79.7,84.4 83.1,87.8 83.1,91.8 v1(83.2,91.9) ; v1(86.975,92.526) 88.626,92.526 88.946,92.846 88.946,96.646 v1(88.392,97.2)
  Bottom Layer w0.254: v1(40.981,90.204) 40.981,98.381 44,101.4 v1(46.175,101.4) ; v1(51.3,80.8) 61.8,80.8 v1(61.9,80.7) ; v1(52.271,89.8) v1(52.271,101.4) ; v1(65.8,82.6) 72.053,76.347 76.501,76.347 78.4,78.246 v1(78.4,84.4) ; v1(83.2,91.9) 83.826,92.526 v1(86.975,92.526) ; v1(88.392,97.2) 89.076,97.2 v1(91.201,95.075)
4A: R22.1 R23.1 U4.12 | length 7.4
  Top Layer w0.254: U4.12@31.05,45.751 33.532,45.751 33.855,46.074 v1(34.902,46.074) v1(34.902,49.457)
4B: R38.1 R39.1 U5.12 | length 6.6
  Top Layer w0.254: U5.12@30.967,67.003 31.015,66.954 v1(34.902,66.954) v1(34.902,64.353)
5A: R24.1 R25.1 U6.1 | length 8
  Top Layer w0.254: v1(47.7,46.074) v1(47.7,49.457) 50.843,49.457 51.575,48.725 U6.1@51.575,48.301
5B: R40.1 R41.1 U7.1 | length 7.7
  Top Layer w0.254: v1(47.7,66.277) v1(47.7,69.85) 49.482,69.85 49.779,69.553 U7.1@51.719,69.553
6A: R26.1 R27.1 U6.5 | length 7.5
  Top Layer w0.254: v1(47.7,39.307) v1(47.7,42.69) 49.1,42.69 49.711,43.301 U6.5@51.575,43.301
6B: R42.1 R43.1 U7.5 | length 8.4
  Top Layer w0.254: v1(47.7,59.132) v1(47.7,62.705) 48.44,62.705 50.288,64.553 U7.5@51.719,64.553
7A: R28.1 R29.1 U6.10 | length 7.6
  Top Layer w0.254: U6.10@62.25,43.251 62.3,43.301 64.29,43.301 64.901,42.69 v1(66.201,42.69) v1(66.201,39.307)
7B: R44.1 R45.1 U7.10 | length 8.4
  Top Layer w0.254: U7.10@62.394,64.503 64.05,64.503 64.753,63.8 64.753,63.39 65.437,62.705 v1(66.201,62.705) v1(66.201,59.132)
8A: R30.1 R31.1 U6.12 | length 7.5
  Top Layer w0.254: U6.12@62.25,45.751 64.25,45.751 64.572,46.074 v1(66.201,46.074) v1(66.201,49.457)
8B: R46.1 R47.1 U7.12 | length 7.7
  Top Layer w0.254: U7.12@62.394,67.003 63.997,67.003 64.723,66.277 v1(66.201,66.277) v1(66.201,69.85)
9A: R63.1 R64.1 U16.1 | length 7.9
  Top Layer w0.254: v1(78.949,66.277) v1(78.949,69.85) 80.703,69.85 81,69.553 U16.1@83.147,69.553
9B: R79.1 R80.1 U17.1 | length 8.2
  Top Layer w0.254: v1(78.949,46.074) v1(78.949,49.457) 82.157,49.457 83.147,48.467 U17.1@83.147,48.301
10A: R65.1 R66.1 U16.5 | length 9.2
  Top Layer w0.254: v1(78.949,59.132) v1(78.949,62.705) 78.949,63.854 79.648,64.553 U16.5@83.147,64.553
10B: R81.1 R82.1 U17.5 | length 7.8
  Top Layer w0.254: v1(78.949,39.307) v1(78.949,42.69) 79.99,42.69 80.5,43.2 83.046,43.2 U17.5@83.147,43.301
11A: R67.1 R68.1 U16.10 | length 9.7
  Top Layer w0.254: U16.10@93.822,64.503 95.85,64.503 96.447,63.906 97.394,63.906 98.595,62.705 v1(99.25,62.705) v1(99.25,59.132)
11B: R83.1 R84.1 U17.10 | length 9
  Top Layer w0.254: U17.10@93.822,43.251 96.849,43.251 97.41,42.69 v1(99.25,42.69) R83.1@99.25,39.307
12A: R69.1 R70.1 U16.12 | length 9.4
  Top Layer w0.254: U16.12@93.822,67.003 97.571,67.003 98.296,66.277 v1(99.25,66.277) ; v1(99.2,69.9) R69.1@99.25,69.85
  Bottom Layer w0.254: v1(99.2,69.9) 99.2,66.327 v1(99.25,66.277)
12B: R85.1 R86.1 U17.12 | length 8.9
  Top Layer w0.254: U17.12@93.822,45.751 97.351,45.751 97.674,46.074 v1(99.25,46.074) v1(99.25,49.457)
13A: R71.1 R72.1 U18.1 | length 8.2
  Top Layer w0.254: v1(110.6,45.911) v1(110.6,49.457) 113.826,49.457 114.575,48.708 U18.1@114.575,48.301
13B: R87.1 R88.1 U19.1 | length 7.7
  Top Layer w0.254: v1(110.6,66.277) v1(110.6,69.85) 111.95,69.85 112.247,69.553 U19.1@114.575,69.553
14A: R73.1 R74.1 U18.5 | length 7.5
  Top Layer w0.254: v1(110.6,39.307) v1(110.6,42.471) 111.27,42.471 112.1,43.301 U18.5@114.575,43.301
14B: R89.1 R90.1 U19.5 | length 8.8
  Top Layer w0.254: v1(110.6,59.132) v1(110.6,62.705) 110.6,63.55 111.603,64.553 U19.5@114.575,64.553
15A: R75.1 R76.1 U18.10 | length 8.5
  Top Layer w0.254: U18.10@125.25,43.251 128.339,43.251 128.95,42.64 v1(130.151,42.64)
  Bottom Layer w0.254: v1(130.151,39.257) v1(130.151,42.64)
15B: R91.1 R92.1 U19.10 | length 9.2
  Top Layer w0.254: U19.10@125.25,64.503 127.497,64.503 129.345,62.655 v1(130.151,62.655) v1(130.151,59.082)
16A: R77.1 R78.1 U18.12 | length 8.4
  Top Layer w0.254: U18.12@125.25,45.751 128.351,45.751 128.624,46.024 v1(130.151,46.024) ; v1(130.151,46.024) v1(130.151,49.407)
16B: R93.1 R94.1 U19.12 | length 10.9
  Top Layer w0.254: U19.12@125.25,67.003 127.846,67.003 128.2,67.357 128.2,69.5 128.5,69.8 v1(130.151,69.8) ; v1(130.151,66.227) v1(130.151,69.8)
+3,5V: DC3.A3 DC3.B3 DC3.C3 U65.1 U65.4 U65.7 U65.12 U66.1 U66.4 U66.7 U66.12 U67.1 U67.4 U67.7 U67.12 U68.1 U68.4 U68.7 U68.12 U69.1 U69.4 U69.7 U69.12 U70.1 U70.4 U70.7 U70.12 U71.1 U71.4 U71.7 U71.12 U72.1 U72.4 U72.7 U72.12 U73.1 U73.4 U73.7 U73.12 U74.1 U74.4 U74.7 U74.12 U75.1 U75.4 U75.7 U76.1 U76.4 U76.7 U76.12 | length 724.2
  Top Layer w0.5: v1(110.3,124.8) 110.3,116.494 v1(113.258,113.536) ; v1(113.258,95.464) v1(113.258,106.136) ; v1(156.25,107.137) 156.45,106.937 v1(156.45,92.305) ; v1(156.25,114.536) v1(156.25,129.334) 156.68,129.334 U71.7@156.7,129.354 ; v1(156.25,136.733) 159.867,136.733 162.367,134.233 U71.12@165.95,134.233 ; v1(156.35,51.136) v1(156.35,64.261) ; v1(156.35,71.661) 156.35,84.805 v1(156.45,84.905) ; v1(192.4,125.6) 192.448,125.552 v1(192.448,114.536) ; v1(192.448,49.886) 192.448,55.448 194.799,57.799 194.799,60.501 192.448,62.852 v1(192.448,65.22) ; v1(192.448,72.62) v1(192.448,84.529) ; v1(192.448,91.929) v1(192.448,107.137)
  Top Layer w1: v1(39.9,143.5) 47.7,143.5 v1(47.8,143.6) ; v1(105,143.6) v1(109.4,143.6) ; v1(136.1,142.7) 142,142.7 v1(142.1,142.8) ; v1(176.3,142.9) v1(179.8,142.9) ; v1(182.446,142.416) 182.462,142.4 184.8,142.4 185.9,141.3 189.8,141.3 192.448,138.652 v1(192.448,136.652)
  Bottom Layer w0.5: 96.1,143.6 96.1,127.1 98.4,124.8 100.906,124.8 100.91,124.804 110.296,124.804 v1(110.3,124.8) ; v1(113.258,88.064) v1(113.258,91.864) v1(113.258,95.464) 116.536,95.464 119.036,92.964 v1(122.958,92.964) ; v1(113.258,106.136) v1(113.258,109.936) v1(113.258,113.536) 116.464,113.536 118.964,111.036 v1(122.958,111.036) ; 156.2,142.8 156.25,142.75 v1(156.25,136.733) v1(156.25,133.133) v1(156.25,129.334) ; v1(156.25,107.137) v1(156.25,110.936) v1(156.25,114.536) 160.28,114.536 162.78,112.036 v1(165.95,112.036) ; v1(156.35,43.737) v1(156.35,47.536) v1(156.35,51.136) 160.964,51.136 163.464,48.636 v1(166.05,48.636) ; v1(156.35,64.261) v1(156.35,68.061) v1(156.35,71.661) 160.139,71.661 162.64,69.16 v1(166.05,69.16) ; v1(156.45,84.905) v1(156.45,88.705) v1(156.45,92.305) 159.495,92.305 161.996,89.804 v1(166.15,89.804) ; v1(192.4,125.6) 192.448,125.648 v1(192.448,129.252) v1(192.448,133.051) v1(192.448,136.652) ; v1(192.448,42.486) 196.486,42.486 197.7,43.7 197.661,43.739 197.661,46.239 ; v1(192.448,46.286) 197.614,46.286 197.661,46.239 ; v1(192.448,49.886) 197.546,49.886 197.661,49.771 197.661,47.385 ; v1(192.448,65.22) v1(192.448,69.02) v1(192.448,72.62) 196.68,72.62 199.181,70.119 v1(202.148,70.119) ; v1(192.448,84.529) v1(192.448,88.329) v1(192.448,91.929) 195.571,91.929 198.072,89.428 v1(202.148,89.428) ; v1(192.448,107.137) v1(192.448,110.936) v1(192.448,114.536) 194.564,114.536 197.064,112.036 v1(202.148,112.036) ; v1(202.148,47.385) 197.661,47.385 ; 197.661,46.239 197.661,47.385
  Bottom Layer w1: DC3.A3@23.675,5.121 DC3.B3@23.675,7.621 DC3.C3@23.675,10.121 23.675,12.8 10.1,26.375 10.1,143.5 11.75,145.15 35.65,145.15 37.3,143.5 v1(39.9,143.5) ; v1(47.8,143.6) 96.1,143.6 v1(105,143.6) ; v1(109.4,143.6) 132.016,143.6 132.916,142.7 v1(136.1,142.7) ; v1(142.1,142.8) 156.2,142.8 176.2,142.8 v1(176.3,142.9) ; v1(179.8,142.9) 181.962,142.9 v1(182.446,142.416)
+5V: DC3.A2 DC3.B2 DC3.C2 R96.2 R99.2 R102.2 R105.2 R108.2 R111.2 R114.2 R117.2 R120.2 R123.2 R126.2 R129.2 R139.2 R140.2 R141.2 R142.2 R151.2 R152.2 R153.2 R154.2 R163.2 R164.2 R165.2 R166.2 R175.2 R176.2 R177.2 R178.2 R187.2 R188.2 R189.2 R190.2 R199.2 R200.2 R201.2 R202.2 R211.2 R212.2 R213.2 R214.2 R223.2 R224.2 R225.2 R227.2 R230.2 R233.2 R236.2 | length 1043.1
  Top Layer w0.254: v1(184.499,44.865) 183.735,44.865 183.354,45.246 183.354,53.2 183.61,53.456 v1(184.499,53.456) ; v1(184.499,66.238) 183.662,66.238 183.354,66.546 183.354,74.454 183.849,74.949 v1(184.499,74.949)
  Top Layer w0.5: v1(131.124,123.076) R105.2@131.124,115.832 131.224,115.732 136.9,115.732 v1(136.9,107.137) v1(136.9,96.7) 136.3,96.1 v1(136.3,92.4) ; v1(137.9,144.2) 137.9,145.5 ; v1(144,43.8) 144.15,43.95 144.15,52.95 144.595,53.395 v1(147.699,53.395) ; 144.757,145.5 144.757,136.157 ; v1(147.692,44.845) R123.2@147.699,44.845 ; v1(147.699,66.139) 145.1,66.139 144.757,66.482 144.757,74.667 ; R139.2@147.699,74.81 144.9,74.81 144.757,74.667 ; R152.2@147.699,86.245 144.802,86.245 144.757,86.2 ; R151.2@147.699,94.87 144.827,94.87 144.757,94.8 ; R164.2@147.699,109.304 144.861,109.304 144.757,109.2 ; R163.2@147.699,116.704 144.83,116.704 144.757,116.632 ; R176.2@147.699,130.15 144.907,130.15 144.757,130.3 ; R175.2@147.699,136.743 145.343,136.743 144.757,136.157 ; R177.2@173.999,127.952 180.452,127.952 180.5,128 ; R178.2@173.999,138.941 179.759,138.941 v1(180.5,138.2) ; R154.2@174.299,94.87 175.213,94.87 176.383,93.7 v1(178.3,93.7) 178.3,98.1 177.75,98.65 177.75,101.152 179.8,103.202 v1(179.8,104) v1(179.8,107.952) 177.352,107.952 176.238,106.838 R165.2@174.549,106.838 ; v1(174.399,53.395) 174.399,55.799 173.85,56.348 173.85,58.55 174.399,59.099 v1(174.399,63.971) ; v1(174.399,74.81) 174.299,74.91 R153.2@174.299,83.981 177.919,83.981 178,83.9 ; R166.2@174.549,119.171 179.329,119.171 v1(180.4,118.1) ; v1(178,80.7) 178,83.9 ; v1(178,85.1) 178,83.9 ; v1(178.3,87.2) 178.309,87.209 v1(178.309,91.7) ; v1(180,110.472) v1(180,115.4) ; v1(180.5,129) 180.5,128 ; v1(180.5,131.2) v1(180.5,135.4) ; v1(181.2,124.3) 180.5,125 180.5,128 ; 181.3,145.5 181.3,139 v1(180.5,138.2) ; v1(184.499,53.456) 184.499,59.899 185.349,60.749 v1(185.349,61.249) ; R211.2@184.499,95.065 184.499,103.399 v1(185.2,104.1) ; v1(184.499,136.586) 182.114,136.586 v1(180.5,138.2) ; v1(209.424,53.456) v1(209.424,64.06) ; v1(209.424,95.065) 209.424,103.424 211.8,105.8 v1(213.2,105.8) 213.2,106.668 213.669,107.137 v1(217.2,107.137) 217.2,106.8 218.184,105.816 218.184,98.834 217.2,97.85 217.2,87.5 216.671,86.971 215.773,86.971 215.752,86.95 215.048,86.95 215.027,86.971 213.858,86.971 213.685,87.144 v1(212.8,87.144) ; v1(209.424,116.632) 214.568,116.632 v1(214.6,116.6) ; v1(211,67.5) 213,69.5 v1(213.5,69.5) ; v1(214.1,46) v1(214.1,52.4) ; v1(215.8,134.7) 215.8,132.7 214.331,131.231 v1(214.331,130.199) 214.331,128.369 217.5,125.2 v1(217.5,116.6) v1(217.5,109.3) ; v1(216.2,69.5) 216.6,69.9 v1(216.6,73.4) ; 144.757,74.667 144.757,86.2 ; 144.757,86.2 144.757,94.8 ; 144.757,94.8 144.757,109.2 ; 144.757,109.2 144.757,116.632 ; 144.757,116.632 144.757,130.3 ; 144.757,130.3 144.757,136.157
  Top Layer w1: DC3.A2@21.175,5.121 DC3.B2@21.175,7.621 DC3.C2@21.175,10.121 21.175,13.4 10.075,24.5 10.075,141.3 12.675,143.9 35.7,143.9 37.4,145.6 49.5,145.6 51.1,147.2 57.2,147.2 58.7,145.7 113.1,145.7 114.6,147.2 125.6,147.2 127.3,145.5 137.9,145.5 144.757,145.5 181.3,145.5 208.5,145.5 v1(211.2,142.8)
  Bottom Layer w0.5: v1(104.776,89.559) 102.041,89.559 101.9,89.7 101.9,97.575 ; v1(104.776,98.35) 102.675,98.35 101.9,97.575 ; v1(104.776,107.181) 104.695,107.1 101.9,107.1 ; v1(104.776,115.832) 102.032,115.832 101.9,115.7 ; v1(131.124,89.559) 134.958,89.559 136.3,90.9 v1(136.3,92.4) ; v1(131.124,98.35) 135.25,98.35 v1(136.9,96.7) ; v1(131.124,107.181) 131.168,107.137 v1(136.9,107.137) ; v1(137.9,144.2) 137.9,128.9 132.076,123.076 v1(131.124,123.076) 131.09,123.042 109.572,123.042 109.538,123.076 104.276,123.076 101.9,120.7 101.9,115.7 ; v1(144,43.8) 146.647,43.8 v1(147.692,44.845) ; v1(147.699,53.395) 149,54.696 149,60 148.6,60.4 148.6,65.238 v1(147.699,66.139) ; v1(174.4,44.944) 173.406,45.937 173.406,52.402 v1(174.399,53.395) ; v1(174.399,63.971) 173.5,64.87 173.5,73.911 v1(174.399,74.81) ; v1(178,80.7) 183.3,80.7 184.499,79.501 v1(184.499,74.949) ; v1(178,85.1) 178.3,85.4 178.3,86.3 ; v1(178.3,87.2) 178.3,86.3 ; v1(178.3,93.7) 178.3,91.709 v1(178.309,91.7) ; v1(179.8,104) 179.9,104.1 v1(185.2,104.1) ; v1(179.8,107.952) 180,108.152 v1(180,110.472) 183.206,110.472 v1(184.473,109.204) ; v1(180,115.4) 180,116.4 ; v1(180.5,129) v1(180.5,131.2) ; v1(180.5,135.4) v1(180.5,138.2) ; v1(181.2,124.3) 182,123.5 182,119.7 v1(180.4,118.1) 180,117.7 180,116.4 ; v1(184.493,86.4) 178.4,86.4 178.3,86.3 ; v1(184.499,66.238) 185.349,65.388 v1(185.349,61.249) ; v1(184.499,116.401) 180.001,116.401 180,116.4 ; v1(184.499,130.001) 183.499,130.001 183.1,130.4 183.1,132.6 183.815,133.315 185.115,133.315 185.5,133.7 185.5,135.585 v1(184.499,136.586) ; v1(209.424,42.717) 213.917,42.717 214.1,42.9 v1(214.1,46) ; v1(209.424,53.456) 213.044,53.456 v1(214.1,52.4) ; v1(209.424,64.06) 210.44,64.06 211,64.62 v1(211,67.5) ; v1(209.424,84.226) 212.726,84.226 212.8,84.3 ; v1(209.424,110.122) 212.578,110.122 213.2,109.5 v1(213.2,105.8) ; v1(209.424,128.817) 210.757,130.15 214.281,130.15 v1(214.331,130.199) ; v1(209.445,74.928) 212.728,74.928 212.8,75 ; v1(211.2,142.8) 211.2,141 215.758,136.442 215.758,134.742 v1(215.8,134.7) ; v1(212.8,87.144) 212.8,84.3 ; v1(213.5,69.5) v1(216.2,69.5) ; v1(214.6,116.6) v1(217.5,116.6) ; v1(216.6,73.4) 213.8,73.4 212.8,74.4 212.8,75 ; v1(217.2,107.137) 217.5,107.436 v1(217.5,109.3) ; 101.9,97.575 101.9,107.1 ; 101.9,107.1 101.9,115.7 ; 212.8,75 212.8,84.3
+6,3V: DC3.A4 DC3.B4 DC3.C4 R1.2 R2.2 R3.2 R4.2 R5.2 R6.2 R7.2 R48.2 R49.2 R50.2 U1.11 U2.11 U3.11 U4.11 U5.11 U6.11 U7.11 U8.11 U9.11 U13.11 U14.11 U15.11 U16.11 U17.11 U18.11 U19.11 U20.11 U21.11 | length 723.3
  Top Layer w0.254: v1(124.5,53.901) 123.879,53.901 123.478,53.5 123.478,44.646 123.623,44.501 v1(125.25,44.501) ; U19.11@125.25,65.753 123.977,65.753 123.024,64.8 123.024,60.976 125.378,58.622 v1(125.378,56.9)
  Top Layer w0.5: v1(13.824,42.69) 12.69,42.69 11.525,41.525 11.525,34.175 12.493,33.207 v1(13.824,33.207) 13.824,31.276 14.4,30.7 19.843,30.7 v1(21.6,32.457) ; v1(27.3,133.826) 27.35,133.826 U1.11@27.4,133.776 ; v1(28.18,37.7) 28.3,37.7 33.1,32.9 36,32.9 36.9,33.8 v1(36.9,35.4) ; v1(28.6,52.4) 28.6,65.3 29.053,65.753 v1(30.967,65.753) ; v1(48.4,122.8) v1@48.4,125.2 ; v1(48.411,120.8) 48.411,117.989 v1(49.1,117.3) ; U2.11@48.535,133.776 52.66,133.776 53.5,134.616 ; v1(53.5,125.2) 53.5,134.616 ; R1.2@53.5,145.6 R2.2@53.5,142.416 v1(53.5,139.232) 53.5,134.616 ; v1(55.5,103.6) 55.5,107.898 56.21,108.608 v1(59.675,108.608) ; v1(59.525,91.276) 57.832,91.276 55.2,88.644 55.2,80.9 64.1,72 v1(64.7,72) ; v1(60.67,117.3) 61.7,116.27 v1(61.7,114.3) ; U6.11@62.25,44.501 70.949,44.501 72.023,45.576 72.023,60.578 v1(71.6,61.001) ; v1(62.394,65.753) 64.308,65.753 65.508,64.553 71.147,64.553 v1(72.1,63.6) ; v1(80.9,61) 86.7,55.2 v1(88.9,55.2) ; v1(86,101.6) 86,100.956 84.532,99.488 84.532,91.568 84.824,91.276 U21.11@86.975,91.276 ; v1(86.775,108.608) 90.308,108.608 91.9,110.2 95.058,110.2 96.446,111.588 96.446,115.154 90,121.6 v1(90,121.7) ; v1(88.273,124.4) 88.673,124.8 v1(93,124.8) ; U16.11@93.822,65.753 96.667,65.753 v1(97.2,65.22) ; v1(93.92,128.12) 99.08,128.12 99.7,127.5 v1(100,127.5) ; v1(103.5,60.9) 104.814,59.586 104.814,55.486 107.9,52.4 v1(116.673,52.4) ; v1(108.5,127.4) v1(114.4,127.4) ; v1(111.94,133.776) 117.324,133.776 117.4,133.7 ; v1(117.4,127.4) 117.4,133.7 ; R48.2@117.4,145.6 v1(117.4,139.232) 117.4,135.026 117.4,133.7
  Top Layer w1: DC3.A4@26.175,5.121 DC3.B4@26.175,7.621 DC3.C4@26.175,10.121 ; v1(64.824,133.776) 64.824,127.876 v1(67.5,125.2)
  Bottom Layer w0.254: v1(124.5,53.901) 125.378,54.779 v1(125.378,56.9)
  Bottom Layer w0.5: v1(21.6,32.457) 22.743,33.6 26.175,33.6 ; 26.175,35.695 v1(28.18,37.7) ; v1(27.3,133.826) 30.774,133.826 31.2,133.4 31.2,125.2 ; v1(28.6,52.4) 28.6,44.8 28.899,44.501 v1(31.05,44.501) 37.316,44.501 39.4,42.417 39.4,37.14 37.66,35.4 v1(36.9,35.4) ; v1(30.967,65.753) 31.513,65.753 34.176,68.416 35.368,68.416 v1(36.802,69.85) ; v1(48.4,122.8) 48.411,122.788 v1(48.411,120.8) ; v1(49.1,117.3) v1(60.67,117.3) ; v1(55.5,103.6) 55.5,93.608 57.832,91.276 v1(59.525,91.276) ; v1(59.675,108.608) 61.667,110.6 61.667,114.267 v1(61.7,114.3) ; v1(62.394,65.753) 63.953,65.753 64.7,66.5 v1(64.7,72) ; v1(72.1,63.6) 72.1,63.3 71.6,62.8 v1(71.6,61.001) v1(80.9,61) v1(80.9,61) ; v1(86,101.6) 84.3,103.3 84.3,108.3 84.608,108.608 v1(86.775,108.608) ; v1(88.273,124.4) 88.273,123.427 v1(90,121.7) ; v1(88.9,55.2) 93.4,55.2 ; v1(90.805,133.776) 94.424,133.776 94.8,133.4 94.8,129 v1(93.92,128.12) ; v1(93.822,44.501) 91.322,44.501 91.322,53.122 93.4,55.2 ; v1@97.3,65 97.3,60.9 ; v1(100,127.5) 108.4,127.5 v1(108.5,127.4) ; v1(103.5,60.9) 97.3,60.9 ; v1(111.94,133.776) 112.964,134.8 132.051,134.8 v1(133.075,133.776) ; v1(114.4,127.4) v1(117.4,127.4) ; v1(116.673,52.4) 118.9,52.4 125.25,46.05 v1(125.25,44.501) ; 93.4,55.2 97.3,59.1 97.3,60.9
  Bottom Layer w0.7: v1(64.824,133.776) v1(69.67,133.776) 73.524,133.776 79.18,128.12 93,128.12 ; v1(93,124.8) 93,128.12 ; v1(93.92,128.12) 93,128.12
  Bottom Layer w1: DC3.C4@26.175,10.121 26.175,33.6 26.175,35.695 26.175,74.392 21.8,78.767 21.8,122.8 24.2,125.2 31.2,125.2 v1(48.4,125.2) v1(53.5,125.2) v1(67.5,125.2)
-23V: DC4.A2 DC4.B2 DC4.C2 R1.1 R48.1 R97.1 R100.1 R103.1 R106.1 R109.1 R112.1 R115.1 R118.1 R121.1 R124.1 R127.1 R130.1 R131.1 R132.1 R133.1 R134.1 R143.1 R144.1 R145.1 R146.1 R155.1 R156.1 R157.1 R158.1 R167.1 R168.1 R169.1 R170.1 R179.1 R180.1 R181.1 R182.1 R191.1 R192.1 R193.1 R194.1 R203.1 R204.1 R205.1 R206.1 R215.1 R216.1 R217.1 R228.1 R231.1 R234.1 R237.1 U2.2 U2.6 U2.9 U14.2 U14.6 U14.9 | length 901.8
  Top Layer w0.5: U2.6@37.86,131.326 37.934,131.4 v1(43.4,131.4) 48.411,131.4 U2.9@48.535,131.276 ; U14.6@101.265,131.326 101.315,131.276 v1(106.9,131.276) ; v1(104.776,87.361) 99.7,87.361 97.6,89.461 97.6,93.9 ; v1(104.776,93.954) 97.654,93.954 97.6,93.9 ; v1(104.776,105.018) 98.782,105.018 97.6,106.2 ; v1(104.776,111.506) 97.706,111.506 97.6,111.4 ; U14.9@111.94,131.276 v1(106.9,131.276) ; v1(131.124,91.757) v1(131.124,93.954) ; v1(131.124,109.344) v1(131.124,111.506) ; v1(139.873,41.1) v1(144,41.1) ; v1(139.873,64.8) v1(144.3,64.8) ; v1(139.9,69.5) 139.953,69.553 v1(142.8,69.553) ; v1(173.999,132.347) v1(173.999,134.545) ; v1(174.299,88.336) v1(174.299,90.514) ; v1(174.399,47.056) v1(174.399,49.169) ; v1(174.399,68.307) v1(174.399,70.474) ; v1(174.549,111.771) v1(174.549,114.238) ; v1(176,80.4) 175.35,79.75 175.35,77.311 v1(176.461,76.2) ; v1(177.1,97.035) 177.05,97.085 177.05,103.05 v1(177.1,103.1) ; v1(178.8,120.7) v1(178.8,125.4) ; v1(209.424,47.012) 212.112,47.012 212.8,47.7 212.8,49.1 ; v1(209.424,49.16) 212.74,49.16 212.8,49.1 ; v1(209.424,68.416) v1(209.424,70.593) 215.393,70.593 ; v1(209.424,88.562) v1(209.424,90.729) 216.029,90.729 216.2,90.9 ; v1(209.424,112.292) 216.215,112.292 216.223,112.3 ; v1(209.424,118.802) 216.221,118.802 216.223,118.8 ; v1(209.424,140.824) v1(209.424,138.756) 211.644,138.756 212.8,137.6 212.8,128.3 216.223,124.877 216.223,118.8 ; v1(212.8,60.9) 212.8,49.1 ; v1(214.4,62.9) 215.4,63.9 215.4,68.4 215.393,68.407 215.393,69.104 215.35,69.148 215.35,69.852 215.393,69.896 215.393,70.593 ; v1(215.4,74.4) 215.4,70.6 215.393,70.593 ; v1(215.4,87.8) 215.4,89.2 216.2,90 216.2,90.9 ; v1(216.2,104.908) 216.2,90.9 ; v1(216.223,109.23) 216.223,112.3 ; 97.6,93.9 97.6,106.2 ; 97.6,106.2 97.6,111.4 ; 97.6,111.4 97.6,117.6 106.9,126.9 v1(106.9,131.276) ; 216.223,112.3 216.223,118.8
  Top Layer w1: DC4.A2@136.15,5.121 DC4.B2@136.15,7.621 DC4.C2@136.15,10.121 136.15,16.45 v1(138.8,19.1)
  Bottom Layer w0.254: v1@184.473,84.2 v1(184.499,84.226)
  Bottom Layer w0.5: v1(37.86,136.326) 43.244,136.326 43.4,136.482 ; v1(101.265,136.326) 106.774,136.326 106.9,136.2 ; v1(106.9,131.276) 106.9,136.2 ; 106.9,145.6 106.9,136.2 ; v1@119.2,145.7 v1(119.3,145.6) ; v1(131.124,93.954) 139.819,93.954 139.873,93.9 ; v1(131.124,111.506) 139.767,111.506 139.873,111.4 ; 139.873,83.946 147.664,83.946 v1(147.699,83.981) ; 139.873,90.5 139.892,90.481 v1(147.699,90.481) ; 139.873,107.2 140.235,106.838 v1(147.699,106.838) ; 139.873,114.2 147.639,114.2 v1(147.676,114.238) ; 139.873,127.9 139.925,127.952 v1(147.699,127.952) ; 139.873,134.6 139.928,134.545 v1(147.699,134.545) ; v1(142.8,69.553) 143.722,70.474 v1(147.699,70.474) ; v1(144,41.1) 145.968,41.1 v1(147.699,42.831) ; v1(144.3,64.8) 145.129,63.971 v1(147.699,63.971) 147.699,61.699 147.1,61.1 144.2,61.1 143,59.9 143,53.43 v1(147.699,48.731) ; v1(173.999,134.545) 174.044,134.5 178.8,134.5 ; v1(174.299,88.336) 174.363,88.4 177.1,88.4 ; v1(174.399,47.056) 176.405,47.056 176.461,47 ; v1(174.399,68.307) 176.461,68.307 ; v1(174.549,111.771) 174.62,111.7 178.8,111.7 ; v1(176,80.4) 177.1,81.5 177.1,84.2 ; v1(176.461,76.2) 176.461,70.6 ; v1(177.1,97.035) 177.1,90.7 ; v1(177.1,103.1) 178.8,104.8 178.8,106.8 ; v1(178.8,120.7) 178.8,114 ; v1(178.8,125.4) 178.8,127.9 ; 178.8,146.127 178.8,134.5 ; v1@184.473,84.2 177.1,84.2 ; v1(184.499,42.717) 178.284,42.717 176.461,44.54 176.461,47 ; v1(184.499,49.16) 176.621,49.16 176.461,49 ; v1(184.499,64.06) 176.501,64.06 176.461,64.1 ; v1(184.499,70.593) 176.468,70.593 176.461,70.6 ; v1(184.499,90.729) 177.129,90.729 177.1,90.7 ; v1(184.499,106.838) 178.838,106.838 178.8,106.8 ; v1(184.499,114.016) 178.816,114.016 178.8,114 ; v1(184.499,127.906) 178.806,127.906 178.8,127.9 ; v1(184.499,134.416) 184.415,134.5 178.8,134.5 ; v1(212.8,60.9) 212.8,61.3 v1(214.4,62.9) ; v1(215.4,74.4) v1(215.4,87.8) ; v1(216.2,104.908) 216.223,104.931 v1(216.223,109.23) ; 176.461,47 176.461,49 ; 176.461,49 176.461,64.1 ; 176.461,64.1 176.461,68.307 ; 176.461,68.307 176.461,70.6 ; 177.1,84.2 177.1,88.4 ; 177.1,88.4 177.1,90.7 ; 178.8,106.8 178.8,111.7 ; 178.8,111.7 178.8,114 ; 178.8,127.9 178.8,134.5
  Bottom Layer w1: v1(43.4,131.4) 43.4,136.482 43.4,143.116 45.884,145.6 106.9,145.6 v1(119.3,145.6) 128,145.6 128.527,146.127 139.873,146.127 ; v1(138.8,19.1) 139.873,20.173 v1(139.873,41.1) 139.873,47.171 139.6,47.444 139.6,48.356 139.873,48.629 v1(139.873,64.8) 139.873,83.946 139.873,90.5 139.873,93.9 139.873,107.2 139.873,111.4 139.873,114.2 139.873,127.9 139.873,134.6 139.873,146.127 ; v1(209.424,140.824) 209.424,144.4 207.697,146.127 178.8,146.127 139.873,146.127
  other v1: 55.4,145.6
.: 